# Altium PCB Karta_TETRA.PCBDOC (part 5 of 8)
Units mm, origin at the board's own origin, x right, y up, seen from the top; angles counter-clockwise.
Board outline 70 x 83.2 mm, 6 copper layers (TopLayer, Layer 1, Layer 2, Layer 3, Layer 4, Bottom Layer), stack 0.914 mm thick; 344 components, 222 nets, 1133 pads, 615 vias.
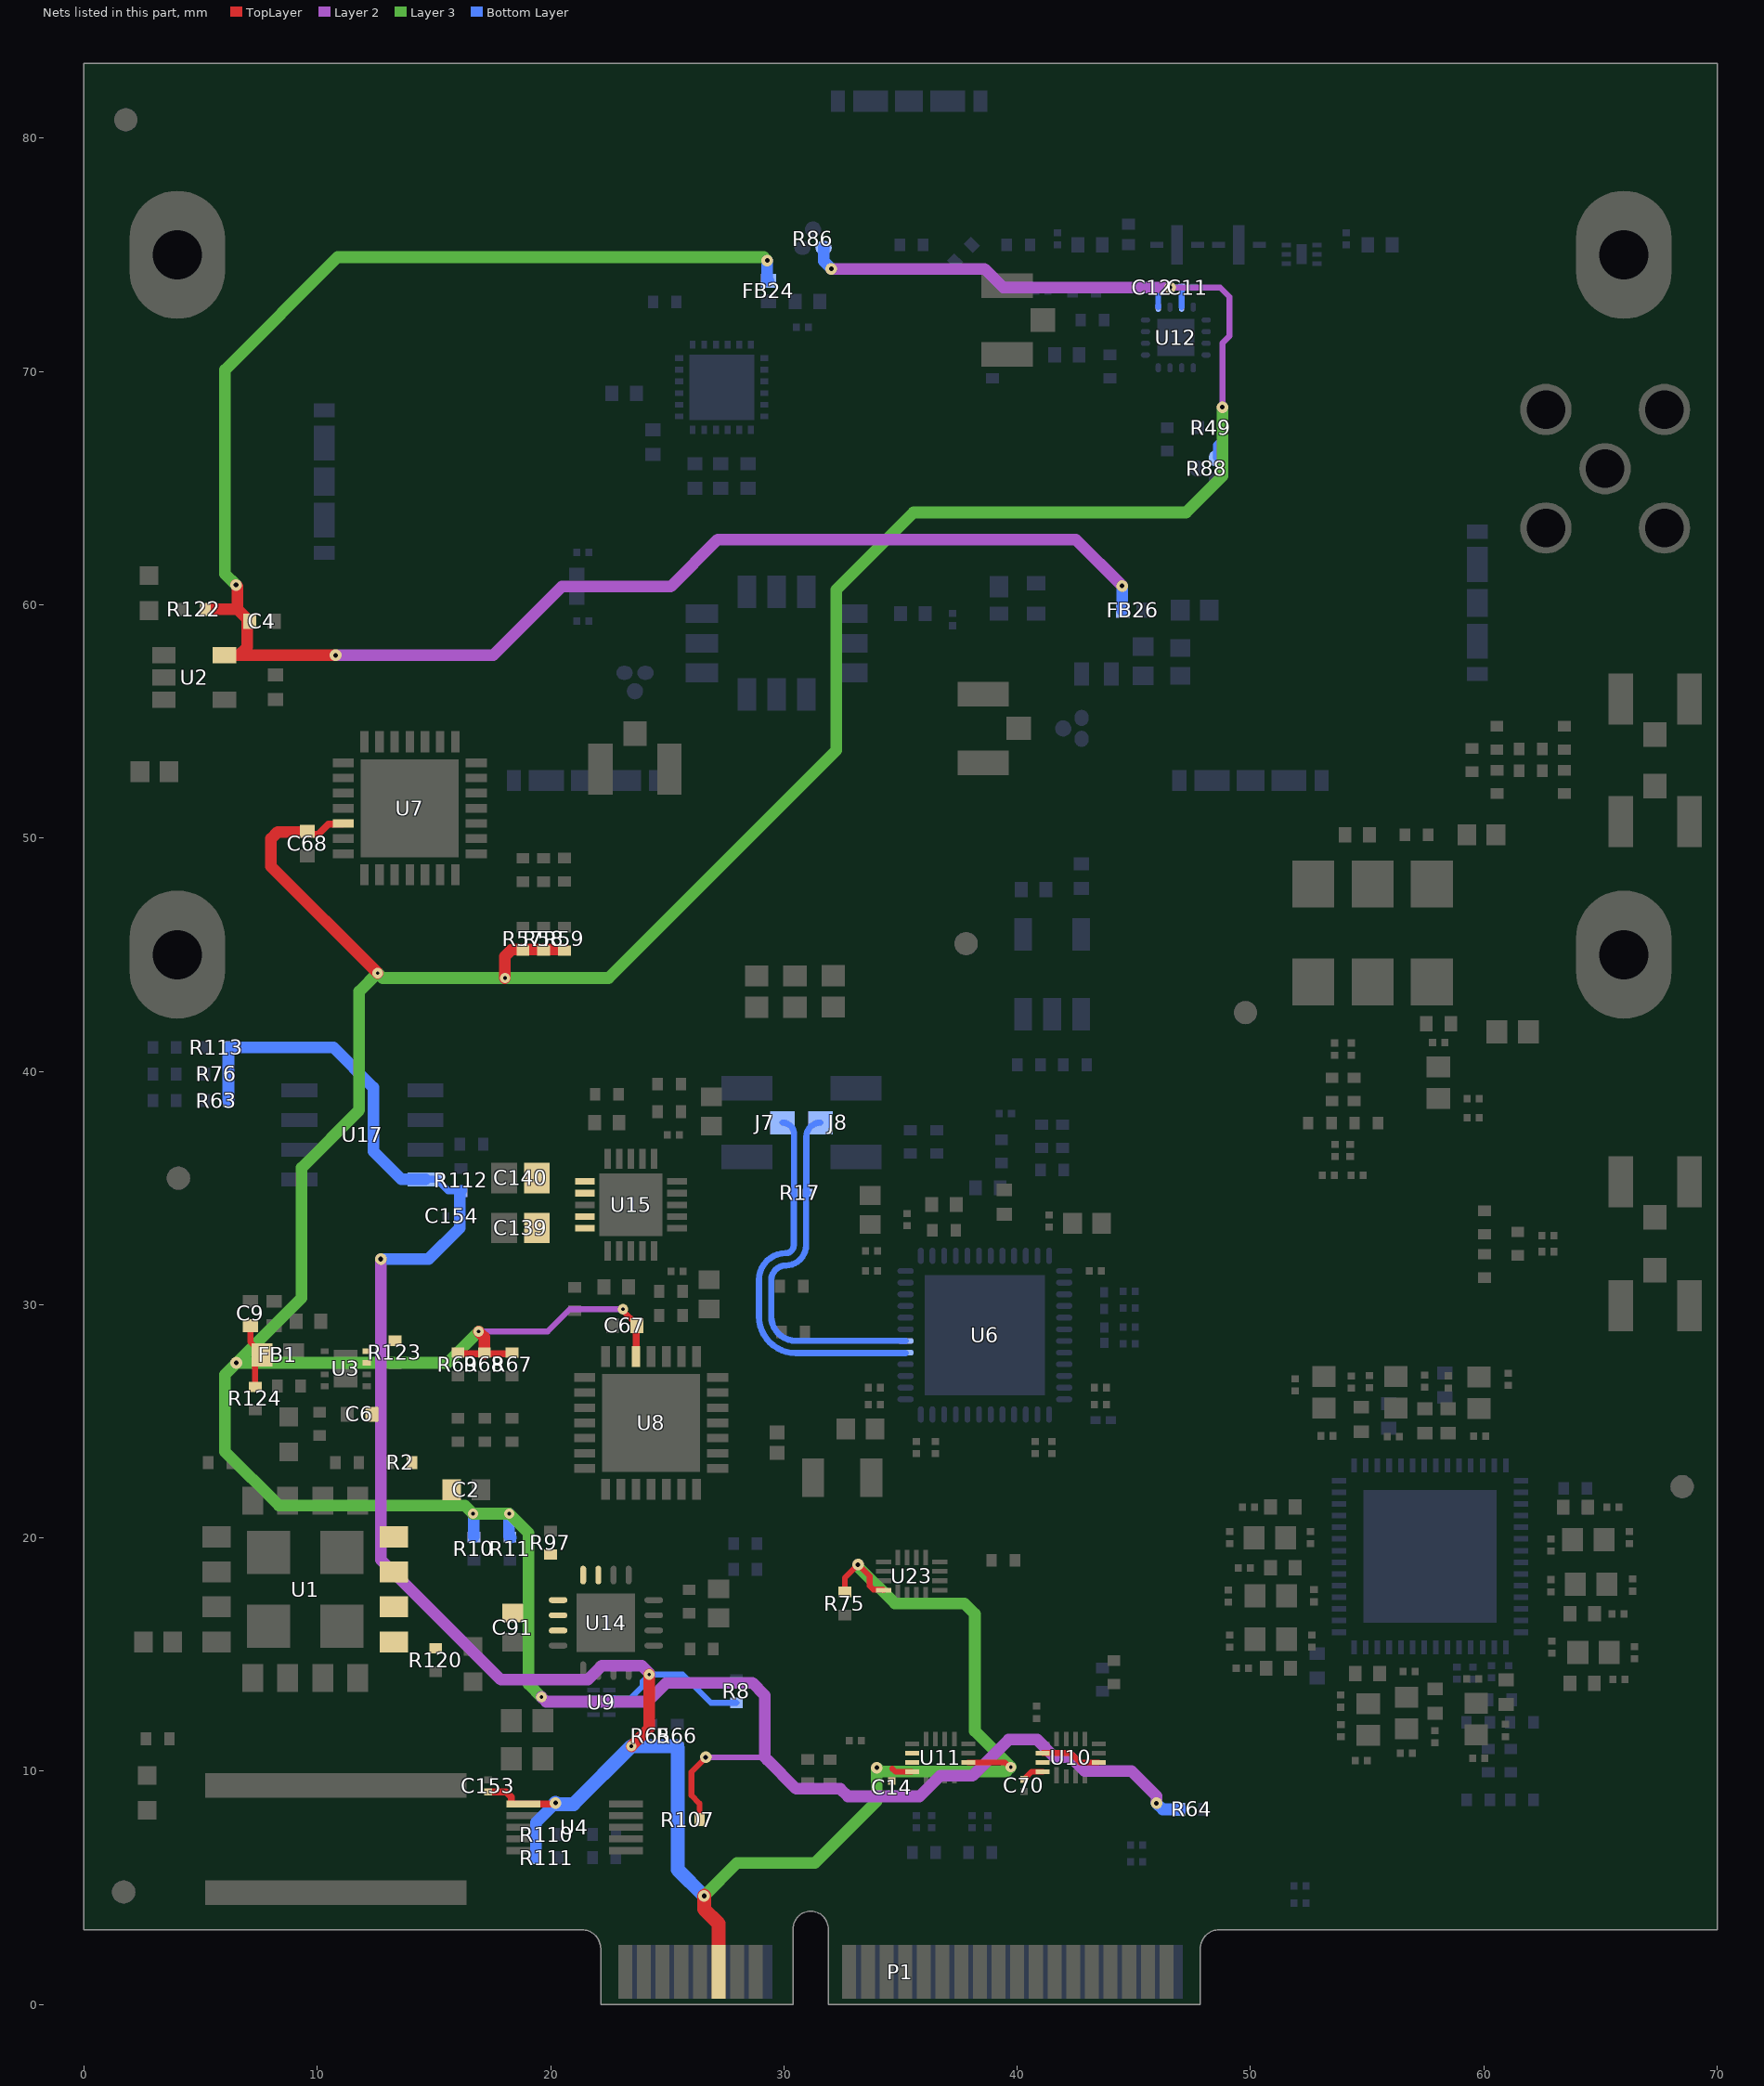
[diagram p6: the nets of this part, all layers, seen from the top]

## Via types
v1: diameter 0.5, hole 0.2, TopLayer to Bottom Layer, tented both sides, 402 vias
v2: diameter 0.45, hole 0.15, TopLayer to Bottom Layer, tented both sides, 189 vias
v3: diameter 0.45, hole 0.15, TopLayer to Bottom Layer, 23 vias
v4: diameter 0.5, hole 0.2, TopLayer to Bottom Layer, 1 vias

## Nets (pads, with @x,y where several pads share a name; then routed paths per layer and width w, separated by ;. In a path a pad name is that pad's centre, name@x,y a point inside that pad or via, vN(x,y) a via of type N, cw(c..) or ccw(c..) an arc to the next point about the centre after c; other vN are vias at no path point) (continued)
3V3_MB: (continued)
  Bottom Layer w0.5: R63.2@6.19,38.743 R76.2@6.19,39.886 R113.2@6.19,41.029 10.686,41.029 12.404,39.312 12.404,36.577 13.607,35.374 U17.8@14.637,35.374 ; v1(12.725,31.953) 14.774,31.953 16.111,33.29 16.111,34.83 R112.2@16.161,34.88 ; R111.1@19.378,6.297 19.378,7.282 19.375,7.285 19.375,7.805 v1(20.209,8.638)
  Bottom Layer w0.6: v1(20.209,8.638) 20.255,8.592 20.988,8.592 v3(23.465,11.069) 25.429,11.069 R66.2@25.429,11.019 25.453,10.995 25.453,8.934 25.453,5.78 v1(26.579,4.655)
3V6_DCDC: C2.2 C6.2 C91.2 C139.2 C140.2 R2.2 R97.2 R120.2 R123.1 U1.9 U1.10 U1.11 U1.12 U3.7 U3.8 U14.1 U14.2 U14.3 U14.15 U14.16 U15.1 U15.2 U15.4 U15.5
5V: C4.2 FB24.1 FB26.1 R122.2 U2.5 | length 82.8
  TopLayer w0.5: R122.2@5.2,59.8 6.581,59.8 ; U2.5@6.019,57.831 6.639,57.831 ; v1(6.519,60.85) 6.581,60.788 6.581,59.8 ; v1(10.786,57.831) 6.639,57.831 ; 6.581,59.8 7,59.381 7,58.192 6.639,57.831
  Layer 2 w0.5: v1(10.786,57.831) 17.531,57.831 20.482,60.782 25.147,60.782 27.164,62.8 42.511,62.8 v1(44.501,60.81)
  Layer 3 w0.5: v1(6.519,60.85) 6.05,61.319 6.05,70.074 10.876,74.9 29.14,74.9 v1(29.285,74.755)
  Bottom Layer w0.5: v1(29.285,74.755) 29.285,73.941 29.335,73.891 FB24.1@29.339,73.891 ; v1(44.501,60.81) 44.501,59.745 FB26.1@44.524,59.768